# Altium PCB Layout.PcbDoc
Units mm, origin at the board's own origin, x right, y up, seen from the top; angles counter-clockwise.
Board outline 72.5 x 55.5 mm, 4 copper layers (Top Layer, Ground Layer, Power Layer, Bottom Layer), stack 1.591 mm thick; 70 components, 36 nets, 228 pads, 194 vias.
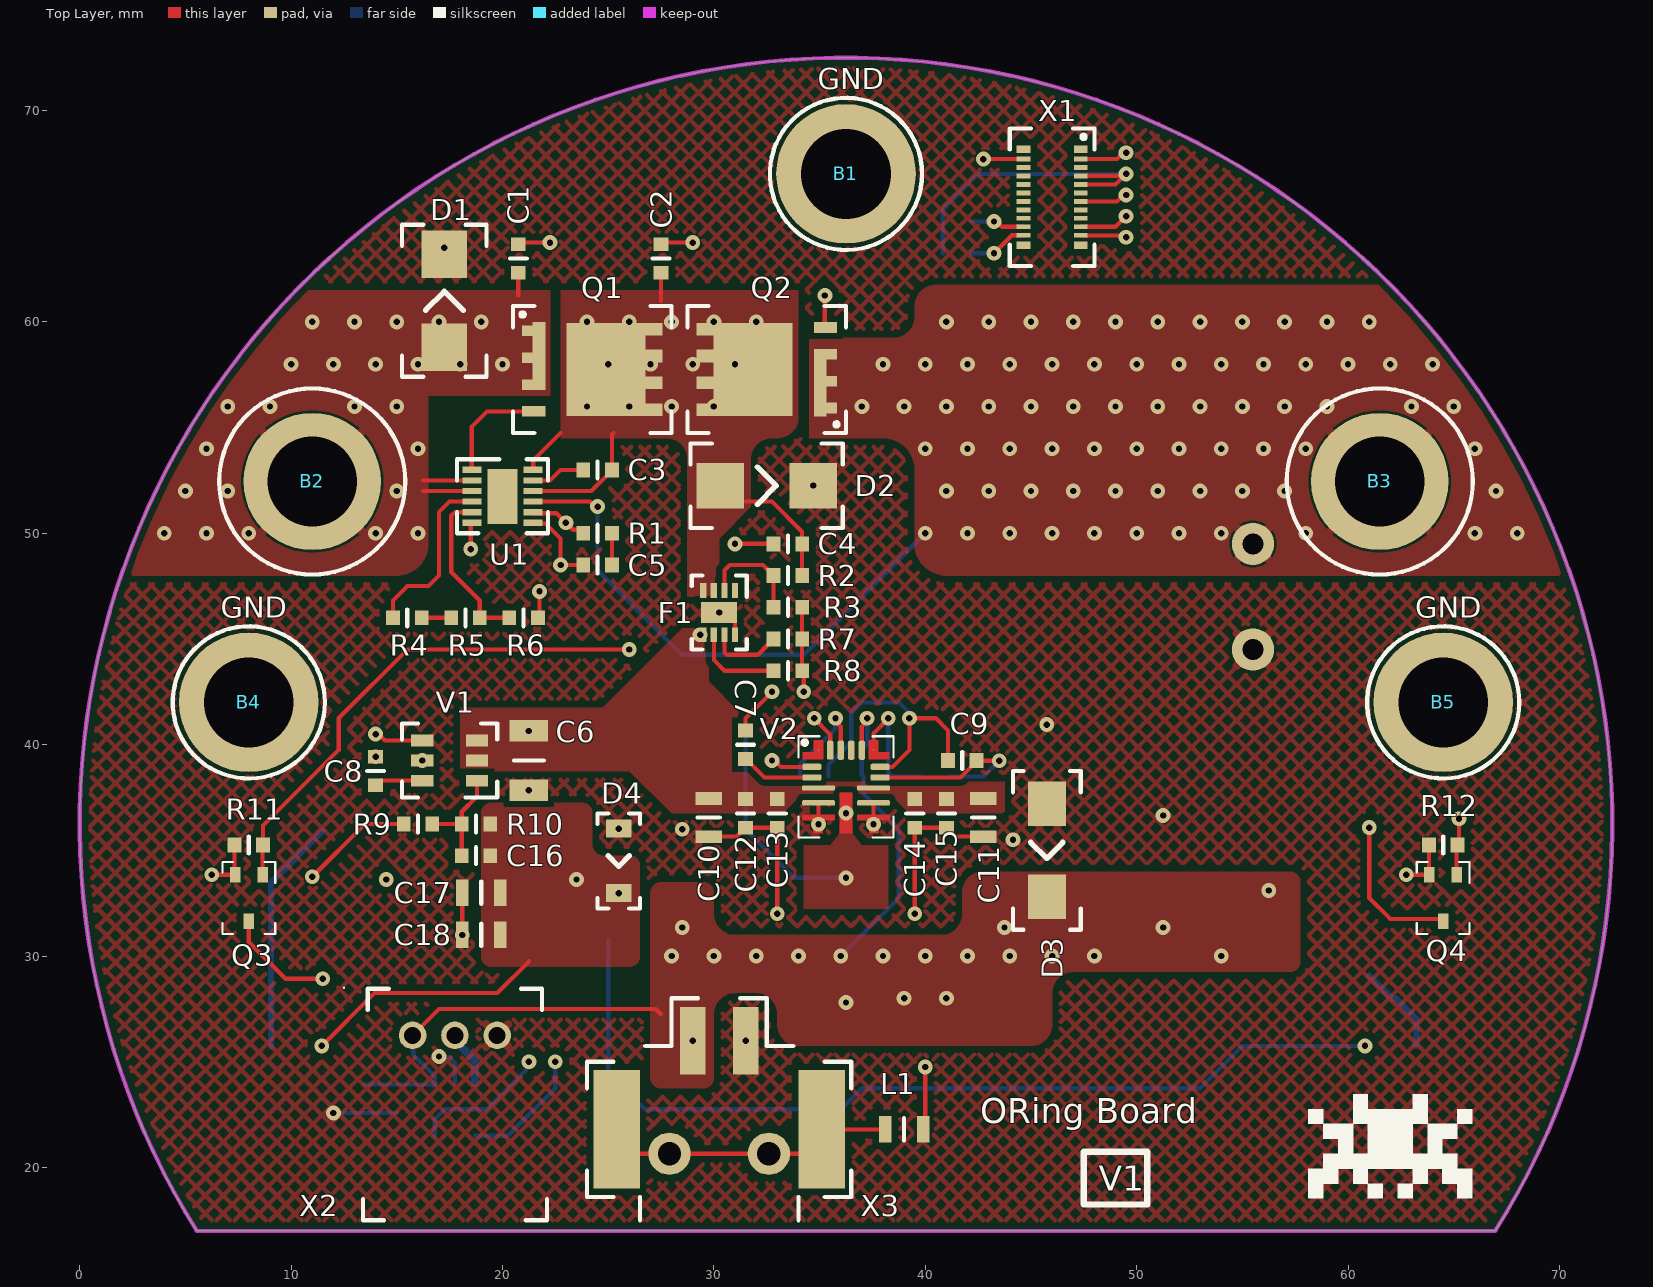
[diagram p0: Top Layer view]
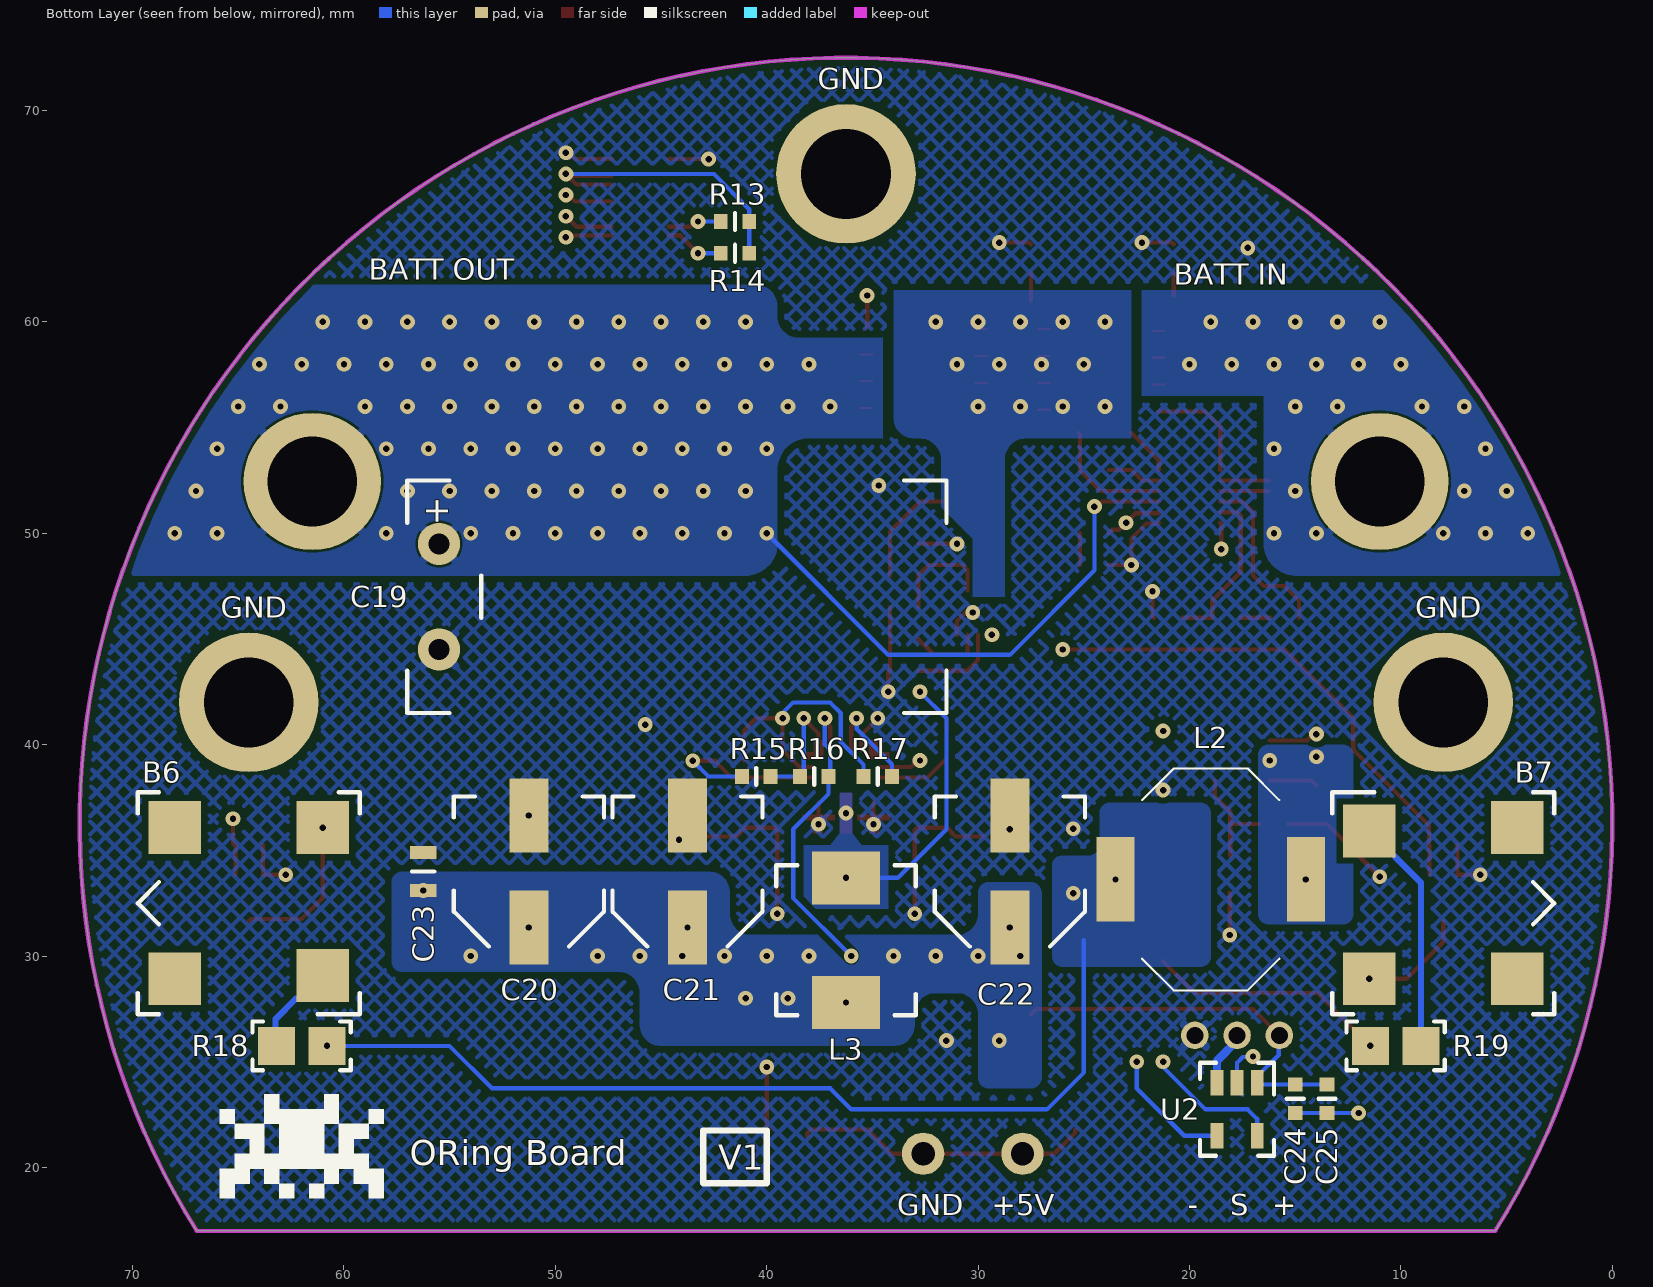
[diagram p1: Bottom Layer view, seen from below]
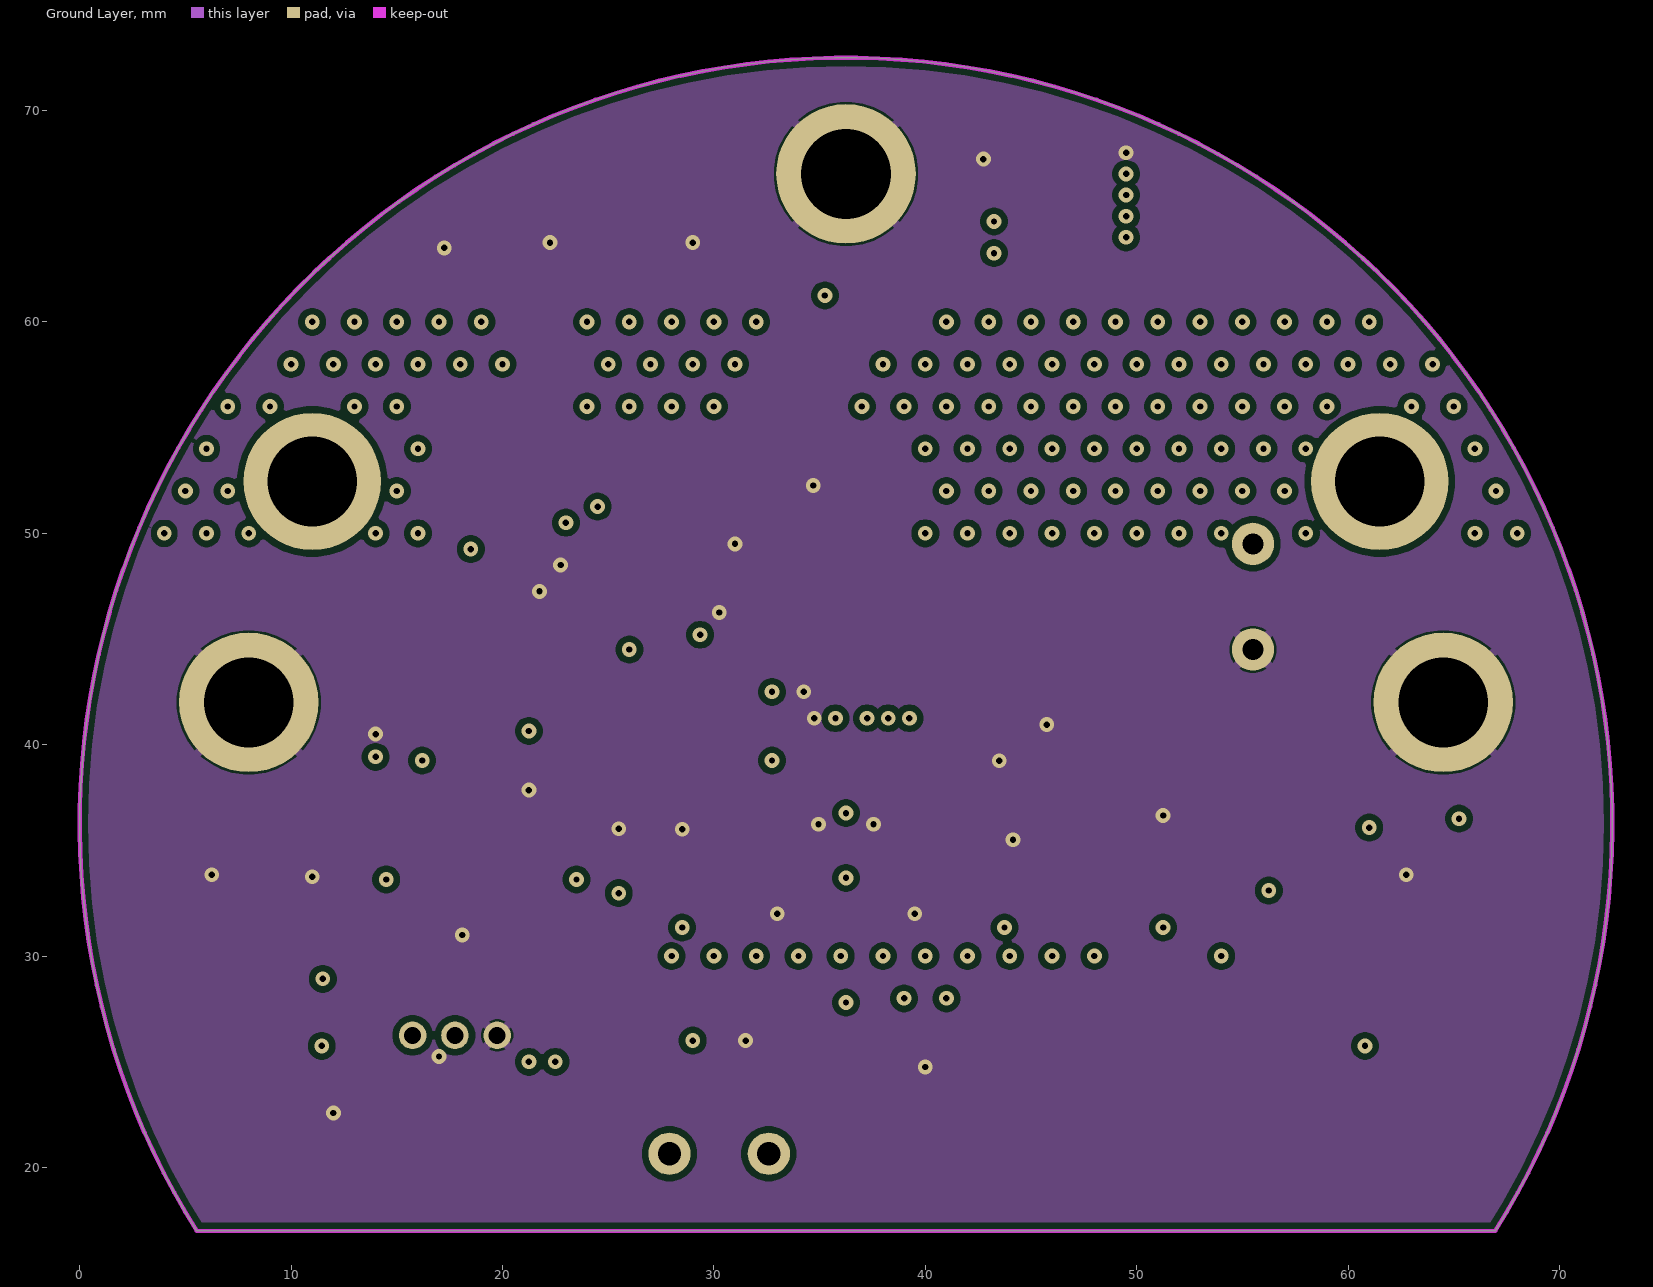
[diagram p2: Ground Layer]
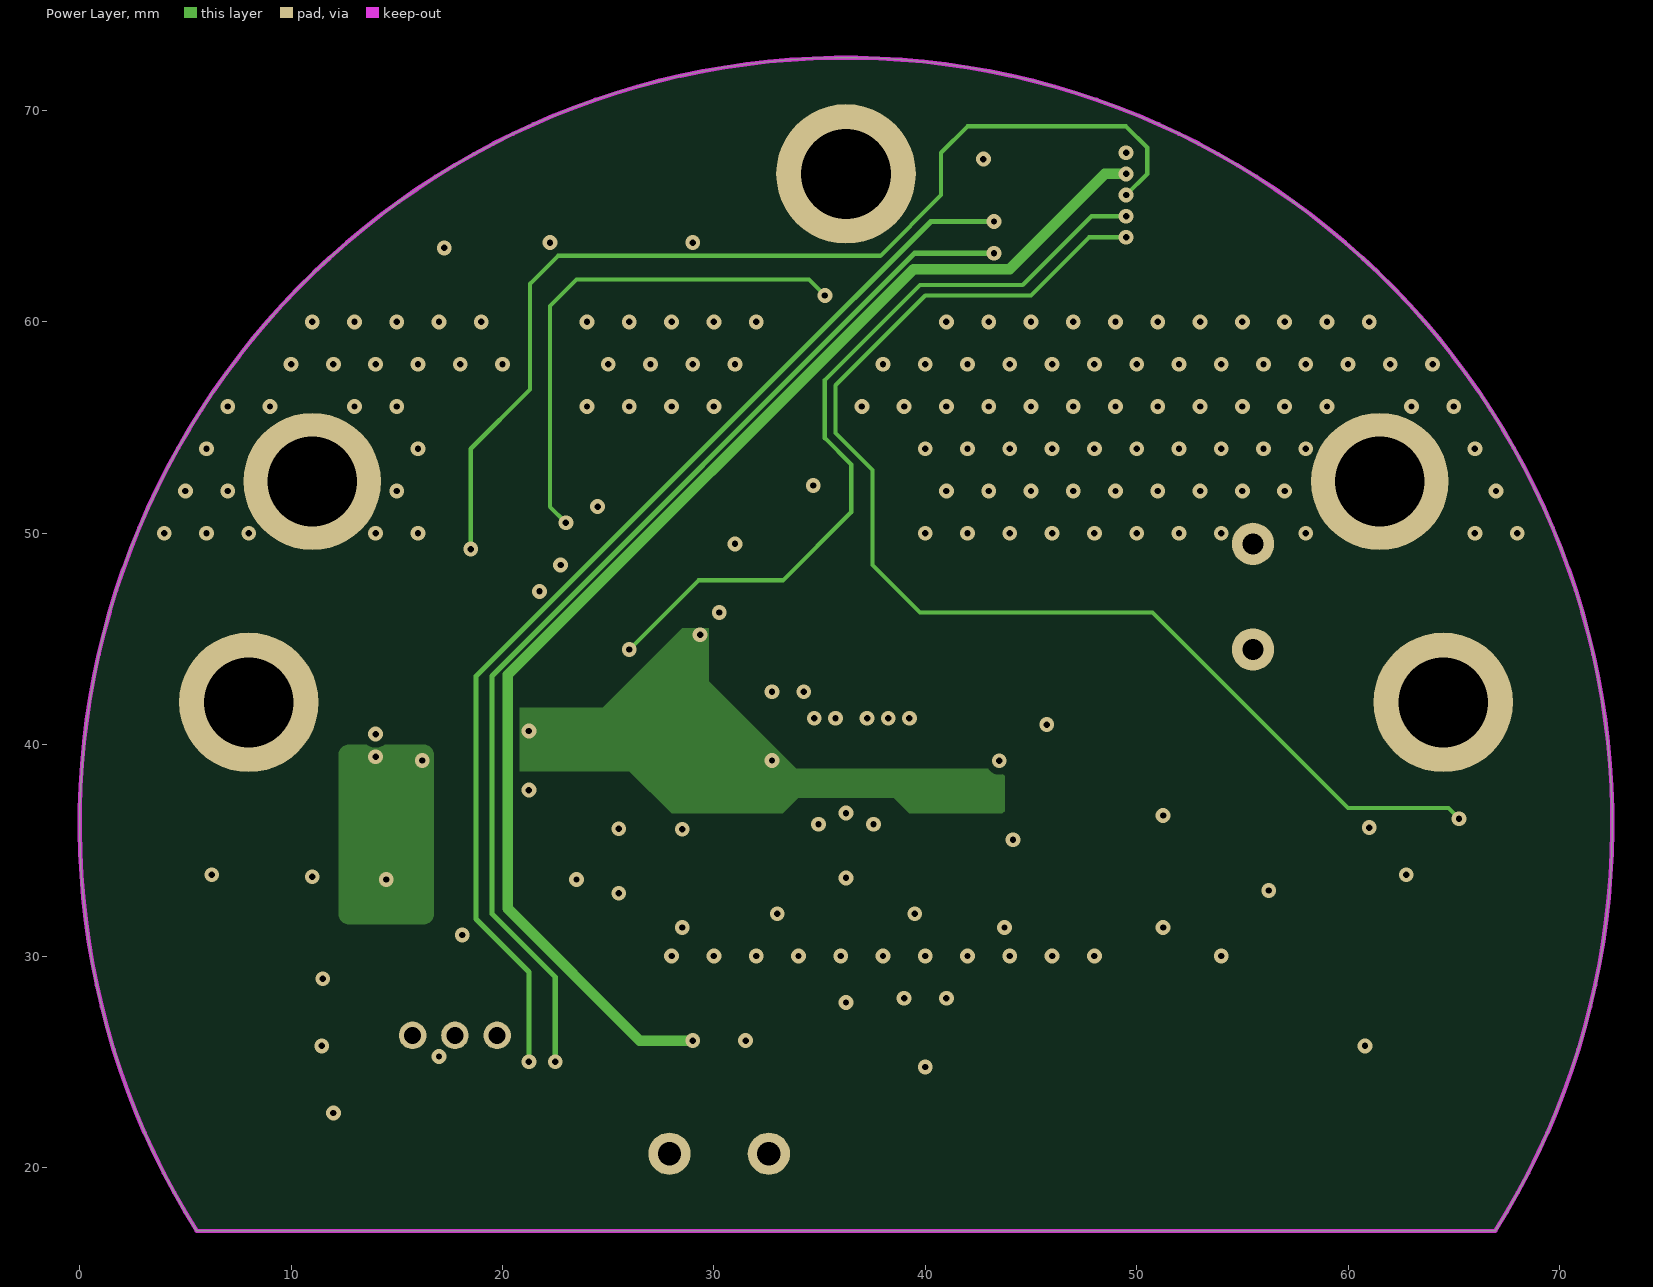
[diagram p3: Power Layer]

## Layer stack, top to bottom
Top Solder: solder mask 0.0102, Solder Resist, Dk 3.8
Top Layer: signal copper 0.035
Dielectric 2: prepreg 0.2104, 7628*1, Dk 4.4
Ground Layer: signal copper 0.0175
Dielectric 1: dielectric 1.065, FR-4, Dk 4.8
Power Layer: signal copper 0.0175
Dielectric 3: prepreg 0.2104, 7628*1, Dk 4.4
Bottom Layer: signal copper 0.035
Bottom Solder: solder mask 0.0102, Solder Resist, Dk 3.8

## Board outline
5.534,17 cw(c36.25,36.25) 66.966,17

## Design rules (kind name [scope] priority, off if disabled: settings)
BoardOutlineClearance [All] p1: gap=0.2 ignorepadtopadclearanceinfootprint=FALSE
Clearance "inPolygon Clearance" [InPolygon] p1: gap=0.3 ignorepadtopadclearanceinfootprint=TRUE // this rule ensures that every net within a polygon of a different net has a set clearance from the poly
Clearance "High Current Polygon Clearance" [(InPolygon AND InNetClass('High_Current_Nets'))] p2: gap=0 ignorepadtopadclearanceinfootprint=TRUE // this rule ensures that every net within a polygon of a different net has a set clearance from the poly
Clearance "Different Diff Pair" [All] p3: gap=0.2 ignorepadtopadclearanceinfootprint=TRUE
Clearance "Same Diff Pair" [All] p4: gap=0.1 ignorepadtopadclearanceinfootprint=TRUE
Clearance "Different Nets" [not InAnyDifferentialPair] p5: gap=0.3 ignorepadtopadclearanceinfootprint=TRUE except(0.1: Arc-SMDPad Arc-THPad Arc-Via Arc-Text Track-SMDPad Track-THPad Track-Via Track-Text SMDPad-Text THPad-Text Via-Text Fill-Text Poly-Text Region-Text Text-Text; 0.12: Arc-Arc Arc-Track Track-Track; 0.15: SMDPad-SMDPad SMDPad-THPad SMDPad-Via THPad-THPad THPad-Via Via-Via; 0.2: Arc-Hole Track-Hole SMDPad-Hole THPad-Hole Via-Hole Fill-Hole Poly-Hole Region-Hole Text-Hole)
Clearance "Same Net" [not InAnyDifferentialPair] p6: gap=0 ignorepadtopadclearanceinfootprint=TRUE except(0.1: THPad-Via; 0.18: Arc-Arc Arc-Track Track-Track)
ComponentClearance [All] p1: gap=0.102 collisioncheckmode=3 verticalgap=0.102 showdistances=TRUE
DiffPairsRouting "Ethernet Routing" [InDifferentialPairClass('Ethernet_Pairs')] p1: maxlimit=0.25 minlimit=0.2 mostfreqgap=0.25 toplayer_maxgap=0.2 toplayer_prefgap=0.2 toplayer_minwidth=0.25 toplayer_maxwidth=0.25 toplayer_prefwidth=0.25 midlayer1_mingap=0.25 midlayer1_minwidth=0.19 midlayer1_maxwidth=0.19 midlayer1_prefwidth=0.19 midlayer2_mingap=0.25 midlayer2_minwidth=0.19 midlayer2_maxwidth=0.19 midlayer2_prefwidth=0.19 bottomlayer_maxgap=0.2 bottomlayer_prefgap=0.2 bottomlayer_minwidth=0.25 bottomlayer_maxwidth=0.25 bottomlayer_prefwidth=0.25 impedanceprofiledriven=TRUE maxuncoupledlength=12.7
DiffPairsRouting "USB Routing" [InDifferentialPairClass('USB_Pairs')] p2: maxlimit=0.291 minlimit=0.127 mostfreqgap=0.291 toplayer_maxgap=0.127 toplayer_prefgap=0.127 toplayer_minwidth=0.23 toplayer_maxwidth=0.23 toplayer_prefwidth=0.23 midlayer1_mingap=0.291 midlayer1_minwidth=0.25 midlayer1_maxwidth=0.25 midlayer1_prefwidth=0.25 midlayer2_mingap=0.291 midlayer2_minwidth=0.25 midlayer2_maxwidth=0.25 midlayer2_prefwidth=0.25 bottomlayer_maxgap=0.127 bottomlayer_prefgap=0.127 bottomlayer_minwidth=0.23 bottomlayer_maxwidth=0.23 bottomlayer_prefwidth=0.23 maxuncoupledlength=12.7
DiffPairsRouting "CAN Routing" [InDifferentialPairClass('CAN_Pairs')] p3: maxlimit=0.907 minlimit=0.5 mostfreqgap=0.907 toplayer_maxgap=0.5 toplayer_prefgap=0.5 toplayer_minwidth=0.201 toplayer_maxwidth=0.201 toplayer_prefwidth=0.201 midlayer1_mingap=0.907 midlayer1_minwidth=0.155 midlayer1_maxwidth=0.155 midlayer1_prefwidth=0.155 midlayer2_mingap=0.907 midlayer2_minwidth=0.155 midlayer2_maxwidth=0.155 midlayer2_prefwidth=0.155 bottomlayer_maxgap=0.5 bottomlayer_prefgap=0.5 bottomlayer_minwidth=0.201 bottomlayer_maxwidth=0.201 bottomlayer_prefwidth=0.201 impedanceprofiledriven=TRUE maxuncoupledlength=12.7
Height [All] p1: minheight=0 maxheight=1816.048 prefheight=12.7
HoleSize [All] p1: absolutevalues=TRUE maxlimit=6.3 minlimit=0.3 maxpercent=80.000 minpercent=20.000
HoleToHoleClearance [All] p1: gap=0.25 allowstackedmicrovias=FALSE
MatchedLengths "XTAL Nets Matched Delays" [InNetClass('XTAL_Nets')] p1: tolerance=25.4 checknetsindiffpair=FALSE checkdiffpairvsdiffpair=TRUE checkxsignals=TRUE checkothers=TRUE usedelayunits=TRUE delaytolerance=10.000000
MatchedLengths "Diff Pair Matched Delays" [InDifferentialPairClass('Ethernet_Pairs') or InDifferentialPairClass('USB_Pairs') or InDifferentialPairClass('CAN_Pairs')] p2: tolerance=5 checknetsindiffpair=TRUE checkdiffpairvsdiffpair=FALSE checkxsignals=FALSE checkothers=FALSE usedelayunits=TRUE delaytolerance=100.000000 phasematching=TRUE phasedelaytolerance=5.000000 phasedistance=12.7
MinimumAnnularRing [All] p1: minimumring=0.2
MinimumSolderMaskSliver [All] p1: minsoldermaskwidth=0
PlaneClearance "Supply Net Clearance" [InNetClass('Supply_Nets')] p1: clearance=0.5
PlaneClearance "All Nets" [All] p2: clearance=0.3
PolygonConnect "High Current" [InNetClass('High_Current_Nets')] p1: thpad.connectstyle=Relief thpad.reliefconductorwidth=0.4 thpad.reliefentries=4 thpad.polygonreliefangle="90 Angle" thpad.airgapwidth=0.1 thpad.conductorbypadedge=TRUE thpad.mindistance=0.381 thpad.enablemindistance=FALSE smdpad.connectstyle=Direct smdpad.reliefconductorwidth=0.254 smdpad.reliefentries=4 smdpad.polygonreliefangle="90 Angle" smdpad.airgapwidth=0.254 via.connectstyle=Direct via.reliefconductorwidth=0.254 via.reliefentries=4 via.polygonreliefangle="90 Angle" via.airgapwidth=0.254
PolygonConnect "Supply Nets" [InNetClass('Supply_Nets') OR InNetClass('Supply_Net')] p2: connectstyle=Relief reliefconductorwidth=0.3 reliefentries=4 polygonreliefangle="90 Angle" conductorbypadedge=TRUE mindistance=0.381 enablemindistance=FALSE airgapwidth=0.254
PolygonConnect General [All] p3: connectstyle=Relief reliefconductorwidth=0.254 reliefentries=4 polygonreliefangle="90 Angle" airgapwidth=0.254
RoutingVias [All] p1: holewidth=0.2 width=0.35 viastyle="Through Hole" minholewidth=0.15 minwidth=0.3 maxholewidth=6.3 maxwidth=6.55
SilkToSilkClearance [All] p1: silktosilkclearance=0
SilkToSolderMaskClearance [All] p1: minsilkscreentomaskgap=0 clearancetoexposedcopper=TRUE
SolderMaskExpansion [All] p1: expansion=0.075 istentingtop=FALSE
SupplyNets "Schematic Supply Nets_6" [InNet('GND')] p1: voltage=0.000
SupplyNets "Schematic Supply Nets_3" [InNet('Earth')] p2: voltage=0.000
SupplyNets "Schematic Supply Nets_1" [InNet('+5V')] p3: voltage=0.000
SupplyNets "Schematic Supply Nets_4" [InNet('+12V')] p4: voltage=0.000
SupplyNets "Schematic Supply Nets" [InNet('BATT Switched')] p5: voltage=0.000
SupplyNets "Schematic Supply Nets_2" [InNet('BATTERY IN')] p6: voltage=0.000
UnRoutedNet [All] p1: checkbadconnections=TRUE
Width "nRF Width" [InNetClass('nRF Signal')] p1: maxlimit=0.379 minlimit=0.263 preferedwidth=0.379 toplayer_minwidth=0.379 midlayer1_maxwidth=0.263 midlayer1_prefwidth=0.263 midlayer2_maxwidth=0.263 midlayer2_prefwidth=0.263 bottomlayer_minwidth=0.379 minimp=50.000000 maximp=50.000000 favimp=50.000000 checkconnectedcopper=TRUE
Width [All] p2: maxlimit=100 minlimit=0.1 preferedwidth=0.2
20 further rules are at their usual default settings.

## Classes and differential pairs
component class "Current Sensor ADC": C24 C25 R13 R14 U2
component class Buzzers: B6 B7 Q3 Q4 R11 R12 R18 R19
net class High_Current_Nets: +5V +12V "+12V Reg SW" "BATT Switched" BATT_always_on "BATTERY IN" CAP DGATE GND HGATE NetC5_2 NetC7_2 VREG_IN
component class Power: C4 C6 C7 C8 C9 C10 C11 C12 C13 C14 C15 C16 C17 C18 C20 C21 C22 C23 D2 D3 D4 F1 L1 L2 L3 R2 R3 R7 R8 R9 R10 R15 R16 R17 V1 V2
component class "ORing Controller": C1 C2 C3 C5 C19 D1 Q1 Q2 R1 R4 R5 R6 U1
component class Connectors: B1 B2 B3 B4 B5 X1 X2 X3

## Components (designator, comment, footprint, x,y, rotation, side; value= is the part's Value field where it differs from the comment)
B1 "M4 4mm Spacer" "[Bolt] M4 len=4mm OD=6mm Spacer" 36.25,67 r0 top
B2 "M4 16mm" "[Bolt] M4 16mm Button Head Hex Bolt" 11,52.45 r0 top
B3 "M4 16mm" "[Bolt] M4 16mm Button Head Hex Bolt" 61.5,52.45 r0 top
B4 "M4 4mm Spacer" "[Bolt] M4 len=4mm OD=6mm Spacer" 8,42 r0 top
B5 "M4 4mm Spacer" "[Bolt] M4 len=4mm OD=6mm Spacer" 64.5,42 r0 top
B6 "Passive buzzer" "[Buzzer] Passive SMD 12V 80mA" 64.5,32.5 r0 bottom
B7 "Passive buzzer" "[Buzzer] Passive SMD 12V 80mA" 8,32.5 r180 bottom
C1 "[Cap] 0603 0.1uF 10% 50V" "[Cap] SMD 0603" 20.75,63 r270 top
C2 "[Cap] 0603 0.1uF 10% 50V" "[Cap] SMD 0603" 27.5,63 r270 top
C3 "[Cap] 0603 0.1uF 10% 50V" "[Cap] SMD 0603" 24.5,53 r0 top
C4 "[Cap] 0603 0.1uF 10% 50V" "[Cap] SMD 0603" 33.5,49.5 r0 top
C5 "[Cap] 0603 0.01uF 10% 50V" "[Cap] SMD 0603" 24.5,48.5 r0 top
C6 "[Cap] 1206 10uF 20% 50V" "[Cap] SMD 1206" 21.25,39.25 r90 top
C7 "[Cap] 0603 0.1uF 10% 50V" "[Cap] SMD 0603" 31.5,40 r90 top
C8 "[Cap] 0603 0.1uF 10% 50V" "[Cap] SMD 0603" 14,38.75 r270 top
C9 "[Cap] 0603 2.2uF 10% 25V" "[Cap] SMD 0603" 41.75,39.25 r180 top
C10 "[Cap] 0805 22uF 20% 25V" "[Cap] SMD 0805" 29.75,36.55 r90 top
C11 "[Cap] 0805 22uF 20% 25V" "[Cap] SMD 0805" 42.75,36.55 r90 top
C12 "[Cap] 0603 0.1uF 10% 50V" "[Cap] SMD 0603" 31.5,36.75 r90 top
C13 "[Cap] 0603 4.7uF 10% 25V" "[Cap] SMD 0603" 33,36.75 r90 top
C14 "[Cap] 0603 4.7uF 10% 25V" "[Cap] SMD 0603" 39.5,36.75 r90 top
C15 "[Cap] 0603 0.1uF 10% 50V" "[Cap] SMD 0603" 41,36.75 r90 top
C16 "[Cap] 0603 12pF 5% 50V" "[Cap] SMD 0603" 18.75,34.75 r0 top
C17 "[Cap] 0805 22uF 20% 25V" "[Cap] SMD 0805" 19,33 r0 top
C18 "[Cap] 0805 22uF 20% 25V" "[Cap] SMD 0805" 19,31 r0 top
C19 "[Cap] Thru-Hole 1000uF 20% 35V" "[Cap] Thru-Hole Right-Angle Polarized 10mm" 55.5,47 r270 bottom
C20 "[Cap] 6.3mm 47uF 20% 35V" "[Cap] SMD Polarized, 6.3mm" 51.25,34 r90 bottom
C21 "[Cap] 6.3mm 47uF 20% 35V" "[Cap] SMD Polarized, 6.3mm" 43.75,34 r90 bottom
C22 "[Cap] 6.3mm 47uF 20% 35V" "[Cap] SMD Polarized, 6.3mm" 28.5,34 r90 bottom
C23 "[Cap] 0805 22uF 20% 25V" "[Cap] SMD 0805" 56.25,34 r270 bottom
C24 "[Cap] 0603 0.1uF 10% 50V" "[Cap] SMD 0603" 15,23.25 r90 bottom
C25 "[Cap] 0603 10uF 20% 16V" "[Cap] SMD 0603" 13.5,23.25 r90 bottom
D1 "DO-214AA" "[Diode] SMD DO-214AA" 17.25,61 r90 top
D2 "DO-214AA" "[Diode] SMD DO-214AA" 32.5,52.25 r0 top
D3 "DO-214AC" "[Diode] SMD DO-214AC" 45.75,35 r270 top
D4 "SOD-123F" "[Diode] SOD-123F" 25.5,34.5 r270 top
F1 "[E-Fuse] 3-18V 4A" "[E-Fuse] 3-18V 4A" 30.25,46.25 r270 top
L1 "652-MH2029-300Y" "[Ferrite] SMD 0805" 39,21.8 r0 top
L2 "[10uH] SMD Nonstandard 3.8A" "[10uH] SMD Nonstandard 3.8A" 19,33.625 r0 bottom
L3 "[2.2uH] SMD Nonstandard 10A" "[Inductor] SMD 7.4 X 6.6 X 3 MM" 36.25,30.75 r270 bottom
Q1 "[NMOS] SMD 40V 175A 0.55mOhm" "[NMOS] SMD 40V 175A 0.55mOhm"#1 24.25,57.75 r270 top
Q2 "[NMOS] SMD 40V 175A 0.55mOhm" "[NMOS] SMD 40V 175A 0.55mOhm"#2 32.5,57.75 r90 top
Q3 "[NMOS] SMD 20V 1.4A 160mOhm" SOT323 8,32.75 r270 top
Q4 "[NMOS] SMD 20V 1.4A 160mOhm" SOT323 64.5,32.75 r270 top
R1 "[100] SMD 0603 1% 1/10W" "[Res] SMD 0603" 24.5,50 r0 top
R2 "[1k] SMD 0603 1% 1/10W" "[Res] SMD 0603" 33.5,48 r0 top
R3 "[392k] SMD 0603 1% 1/10W" "[Res] SMD 0603" 33.5,46.5 r180 top
R4 "[90.9k] SMD 0603 1% 1/10W" "[Res] SMD 0603" 15.5,46 r180 top
R5 "[9.09k] SMD 0603 1% 1/10W" "[Res] SMD 0603" 18.25,46 r180 top
R6 "[3.48k] SMD 0603 1% 1/10W_1" "[Res] SMD 0603" 21,46 r0 top
R7 "[698] SMD 0603 1% 1/10W_1" "[Res] SMD 0603" 33.5,45 r180 top
R8 "[10k] SMD 0603 1% 1/8W" "[Res] SMD 0603" 33.5,43.5 r180 top
R9 "[30.1k] SMD 0603 1% 1/10W" "[Res] SMD 0603" 16,36.25 r0 top
R10 "[422k] SMD 0603 1% 1/10W" "[Res] SMD 0603" 18.75,36.25 r0 top
R11 "[1M] SMD 0603 1% 1/10W" "[Res] SMD 0603" 8,35.25 r0 top
R12 "[1M] SMD 0603 1% 1/10W" "[Res] SMD 0603" 64.5,35.25 r0 top
R13 "[1k] SMD 0603 1% 1/10W" "[Res] SMD 0603" 41.5,64.75 r180 bottom
R14 "[1k] SMD 0603 1% 1/10W" "[Res] SMD 0603" 41.5,63.25 r180 bottom
R15 "[10k] SMD 0603 1% 1/8W" "[Res] SMD 0603" 40.5,38.5 r180 bottom
R16 "[52.3k] SMD 0603 1% 1/10W" "[Res] SMD 0603" 37.75,38.5 r180 bottom
R17 "[1k] SMD 0603 1% 1/10W" "[Res] SMD 0603" 34.75,38.5 r180 bottom
R18 "[100] SMD 1206 0.5% 1W" "[Res] SMD 1206" 62,25.75 r180 bottom
R19 "[100] SMD 1206 0.5% 1W" "[Res] SMD 1206" 10.25,25.75 r0 bottom
U1 "[ORing] Back-to-Back External NMOS Controller" "[ORing] Back-to-Back External NMOS Controller" 20,51.75 r0 top
U2 "[ADC] 2.7-5.5V 12bit Single-Ended" "[ADC] 2.7-5.5V 12bit Single-Ended" 17.75,22.75 r270 bottom
V1 "SOT-23" SOT-23 17.5,39.25 r180 top
V2 "[Switching] SMD 0.8-10V 8A" "[Switching] 17-PowerWFQFN" 36.25,38 r0 top
X1 "[Mezzanine] 20pin 0.4mm Female" "[Mezzanine] 20pin 0.4mm Female" 46,65.9 r270 top
X2 "[Sherlock] 3pin 90deg" "[Sherlock] 3pin 90deg" 17.75,26.25 r180 top
X3 "[Pheonix] 2pin 2.5mm pitch" "[Pheonix] 2pin 2.5mm pitch" 30.25,26 r0 top

## Footprints (in the part's own frame and the unit in brackets; to place one, negate y for a bottom-side part, rotate by r counter-clockwise, add the part's x,y. Pads: shape width x height; smd on the part's side, far side on the other; paste and mask are expansions set on the pad)
"[10uH] SMD Nonstandard 3.8A" [mm] "SRU1038-100Y"
  rect 1.8x4 smd: 1(-4.5,0) 2(4.5,0)
  silkscreen extent -3.25,-5.25 3.25,5.25, body extent -5,-5 5,5, height 3.85
"[ADC] 2.7-5.5V 12bit Single-Ended" [mm] "MCP3221A0T-E/OT"
  rect 1.2x0.6 smd: 1(-1.25,0.95) 2(-1.25,0) 3(-1.25,-0.95) 4(1.25,-0.95) 5(1.25,0.95)
  silkscreen extent -2.2,-1.75 2.2,1.75, body extent -1.4,-1.45 1.4,1.45, height 1.2
"[Bolt] M4 16mm Button Head Hex Bolt" [mm]
  round 6.5 hole 4.25: 1(0,0)
  silkscreen extent -4.4,-4.4 4.4,4.4, body extent -3.8,-3.8 3.8,3.8, height 2.2
"[Bolt] M4 len=4mm OD=6mm Spacer" [mm]
  round 6.6 hole 4.25: 1(0,0)
  silkscreen extent -3.6,-3.6 3.6,3.6, body extent -3,-3 3,3, height 4
"[Buzzer] Passive SMD 12V 80mA" [mm] "CT08E-16S400-2"
  rect 2.5x2.5 smd: 1(-3.5,3.424) 2(-3.5,-3.576) MP(3.5,-3.576) MP(3.5,3.576)
  silkscreen extent -5.25,-5.25 5.25,5.25, body extent -4.25,-4.25 4.25,4.25, height 4
"[Cap] SMD 0603" [mm]
  rect 0.65x0.7 smd: 1(-0.675,0) 2(0.675,0)
  silkscreen extent 0,-0.4 0,0.4, body extent -0.8,-0.45 0.8,0.45, height 0.8
"[Cap] SMD 0805" [mm]
  rect 0.6x1.25 smd: 1(-0.9,0) 2(0.9,0)
  silkscreen extent 0,-0.53 0,0.53, body extent -1,-0.63 1,0.63, height 1
"[Cap] SMD 1206" [mm]
  rect 1.02x1.82 smd: 1(-1.4,0) 2(1.4,0)
  silkscreen extent 0,-0.7 0,0.7, body extent -1.7,-0.9 1.7,0.9, height 1.8
"[Cap] SMD Polarized, 6.3mm" [mm]
  rect 3.5x1.85 smd: 1(-2.65,0) 2(2.65,0)
  silkscreen extent -3.55,-3.55 3.55,3.55, body extent -3.7,-3.4 3.7,3.4, height 6.1
"[Cap] Thru-Hole Right-Angle Polarized 10mm" [mm]
  round 2 hole 1: 1(-2.5,0) 2(2.5,0)
  silkscreen extent -5.5,-1.5 5.5,24, body extent -5,-0.3 5,23.5, height 9.99
"[Diode] SMD DO-214AA" [mm]
  rect 2.25x2.15 smd: 1(2.2,0) 2(-2.2,0)
  silkscreen extent -3.6,-2 3.6,2, body extent -2.68,-1.75 2.68,1.75, height 2.3
"[Diode] SMD DO-214AC" [mm]
  rect 2.1x1.8 smd: 1(2.2,0) 2(-2.2,0)
  silkscreen extent -3.75,-1.6 3.75,1.6, body extent -3.07,-1.33 3.07,1.33, height 2.39
"[Diode] SOD-123F" [mm]
  rect 0.85x1.2 smd: 1(1.525,0) 2(-1.525,0)
  silkscreen extent -2.25,-1 2.25,1, body extent -1.75,-0.8 1.75,0.8, height 0.8
"[E-Fuse] 3-18V 4A" [mm] "TPS259571DSGR"
  rect 0.7x0.3 smd: 1(-1.05,0.75) 2(-1.05,0.25) 3(-1.05,-0.25) 4(-1.05,-0.75) 5(1.05,-0.75) 6(1.05,-0.25) 7(1.05,0.25) 8(1.05,0.75)
  rect 1x1.7 smd: 9(0,0)
  silkscreen extent -1.75,-1.3 1.75,1.3, body extent -1.05,-1 1.05,1, height 0.8
"[Ferrite] SMD 0805" [mm]
  rect 0.6x1.25 smd: 1(-0.9,0) 2(0.9,0)
  silkscreen extent 0,-0.53 0,0.53, body extent -1,-0.6 1,0.6, height 1.1
"[Inductor] SMD 7.4 X 6.6 X 3 MM" [mm]
  rect 2.5x3.2 smd: 1(-2.95,0) 2(2.95,0)
  silkscreen extent -3.55,-3.3 3.55,3.3, body extent -3.55,-3.3 3.55,3.3, height 3
"[Mezzanine] 20pin 0.4mm Female" [mm] "DF40C-20DP-0.4V(51)"
  rect 0.23x0.66 smd paste+0 mask+0.102: 1(-1.8,1.355) 2(-1.8,-1.355) 3(-1.4,1.355) 4(-1.4,-1.355) 5(-1,1.355) 6(-1,-1.355) 7(-0.6,1.355) 8(-0.6,-1.355) 9(-0.2,1.355) 10(-0.2,-1.355) 11(0.2,1.355) 12(0.2,-1.355) 13(0.6,1.355) 14(0.6,-1.355) 15(1,1.355) 16(1,-1.355) 17(1.4,1.355) 18(1.4,-1.355) 19(1.8,1.355) 20(1.8,-1.355)
  rect 0.35x0.66 smd paste+0 mask+0.102: MP(-2.275,1.355) MP(-2.275,-1.355) MP(2.275,1.355) MP(2.275,-1.355)
  silkscreen extent -3.25,-2 3.25,2, body extent -2.76,-1.48 2.76,1.49, height 1.14
"[NMOS] SMD 40V 175A 0.55mOhm"#1 [mm] "IAUCN04S7N005ATMA1"
  rect 0.5x0.5 smd: 1(-1.825,-3.075) 1(-0.555,-3.075) 1(0.715,-3.075)
  rect 3.2x0.6 smd: 1(-0.635,-2.525)
  rect 0.5x1.1 smd: 2(1.985,-2.775)
  rect 0.6x0.8 smd: 3(-1.905,2.925) 3(-0.635,2.925) 3(0.635,2.925) 3(1.905,2.925)
  rect 4.41x3.75 smd: 3(0,0.65)
  Top Layer lines w0.1: 0.715,-3.075 0.715,-2.525 0.715,-2.495 ; -0.555,-3.075 -0.555,-2.525 -0.555,-2.495 ; -1.825,-3.075 -1.825,-2.525 -1.825,-2.495 ; 1.905,2.345 1.905,2.925 ; 0.635,2.345 0.635,2.925 ; -0.635,2.345 -0.635,2.925 ; -1.905,2.345 -1.905,2.925
  silkscreen extent -3,-3.75 3,3.75, body extent -2.71,-3.22 2.71,3.22, height 1
"[NMOS] SMD 40V 175A 0.55mOhm"#2 [mm] "IAUCN04S7N005ATMA1"
  rect 0.5x0.5 smd: 1(-1.825,-3.075) 1(-0.555,-3.075) 1(0.715,-3.075)
  rect 3.2x0.6 smd: 1(-0.635,-2.525)
  rect 0.5x1.1 smd: 2(1.985,-2.775)
  rect 0.6x0.8 smd: 3(-1.905,2.925) 3(-0.635,2.925) 3(0.635,2.925) 3(1.905,2.925)
  rect 4.41x3.75 smd: 3(0,0.65)
  Top Layer lines w0.1: -1.905,2.925 -1.905,2.345 ; -0.635,2.925 -0.635,2.345 ; 0.635,2.925 0.635,2.345 ; 1.905,2.925 1.905,2.345 ; -1.825,-2.495 -1.825,-3.075 ; -0.555,-2.495 -0.555,-3.075 ; 0.715,-2.495 0.715,-3.075
  silkscreen extent -3,-3.75 3,3.75, body extent -2.71,-3.22 2.71,3.22, height 1
"[ORing] Back-to-Back External NMOS Controller" [mm] "LM74810QDRRRQ1"
  rect 0.9x0.3 smd: 1(-1.45,1.25) 2(-1.45,0.75) 3(-1.45,0.25) 4(-1.45,-0.25) 5(-1.45,-0.75) 6(-1.45,-1.25) 7(1.45,-1.25) 8(1.45,-0.75) 9(1.45,-0.25) 10(1.45,0.25) 11(1.45,0.75) 12(1.45,1.25)
  rect 1.4x2.6 smd: 13(0,0)
  silkscreen extent -2.15,-1.75 2.15,1.75, body extent -1.5,-1.5 1.5,1.5, height 0.8
"[Pheonix] 2pin 2.5mm pitch" [mm] "1778764"
  rect 1.2x3.2 smd: 1(-1.25,0) 2(1.25,0)
  rect 2.2x5.6 smd: MP(-4.85,-4.2) MP(4.85,-4.2)
  round 2 hole 1.1: MP(-2.35,-5.35) MP(2.35,-5.35)
  silkscreen extent -6.25,-8.5 6.25,2, body extent -5.3,-8.18 5.3,1.32, height 5
"[Res] SMD 0603" [mm]
  rect 0.65x0.7 smd: 1(-0.675,0) 2(0.675,0)
  silkscreen extent 0,-0.4 0,0.4, body extent -0.8,-0.45 0.8,0.45, height 0.8
"[Res] SMD 1206" [mm]
  rect 1.75x1.8 smd: 1(-1.2,0) 2(1.2,0)
  silkscreen extent -2.32,-1.15 2.32,1.15, body extent -1.6,-0.8 1.6,0.8, height 0.55
"[Sherlock] 3pin 90deg" [mm] "0353630360"
  round 1.3 hole 0.8: 1(2,0) 2(0,0) 3(-2,0)
  silkscreen extent -4.35,-2.2 4.35,8.75, body extent -4.85,-1.98 4.85,8.52, height 5.43
"[Switching] 17-PowerWFQFN" [mm]
  rrect50% 0.9x0.3 smd: 1(-1.612,0.95) 2(-1.612,0.45) 10(1.612,0.45) 11(1.612,0.95)
  rrect50% 1.55x0.25 smd: 3(-1.299,-0.05) 4(-1.299,-0.75) 8(1.3,-0.75) 9(1.3,-0.05)
  round 0.025 smd: 5(-1.3,-1.763) 6(0,-1.238) 7(1.3,-1.763) 12(1.3,1.75) 12(1.787,1.475) 17(-1.788,1.475) 17(-1.3,1.75)
  rect 0.127x0.127 smd paste-0.064 mask-0.064: 10(1.612,0.45) 11(1.612,0.95)
  rrect50% 0.3x0.9 smd: 13(0.75,1.736) 14(0.25,1.736) 15(-0.25,1.737) 16(-0.75,1.737)
  Top Layer region: -0.3,-0.275 0.3,-0.275 0.3,-2.2 -0.3,-2.2
  Top Layer region: -1.1,-1.575 -0.525,-1.575 -0.525,-1.325 -2.075,-1.325 -2.075,-1.575 -1.55,-1.575 -1.55,-2.2 -1.1,-2.2
  Top Layer region: 1.1,-1.575 0.525,-1.575 0.525,-1.325 2.075,-1.325 2.075,-1.575 1.55,-1.575 1.55,-2.2 1.1,-2.2
  Top Layer region: -1.525,1.65 -1.525,1.3 -1.075,1.3 -1.075,2.2 -1.525,2.2
  Top Layer region: -2.05,1.65 -1.525,1.65 -1.525,1.3 -2.05,1.3
  Top Layer region: 1.525,1.65 1.525,1.3 1.075,1.3 1.075,2.2 1.525,2.2
  Top Layer region: 2.05,1.65 1.525,1.65 1.525,1.3 2.05,1.3
  silkscreen extent -2.25,-2.4 2.25,2.4, body extent -1.75,-1.88 1.75,1.88, height 0.8
SOT323 [mm]
  rect 0.75x0.5 smd: 1(-1.1,0.65) 2(-1.1,-0.65) 3(1.1,0)
  silkscreen extent -1.7,-1.25 1.7,1.25, body extent -1.05,-1 1.05,1, height 1
SOT-23 [mm]
  rect 1.05x0.55 smd: 1(-1.3,0.95) 2(-1.3,0) 3(-1.3,-0.95) 4(1.3,-0.95) 5(1.3,0) 6(1.3,0.95)
  silkscreen extent -2.25,-1.75 2.25,1.75, body extent -1.4,-1.45 1.4,1.45, height 1

## Part data
B1 B4 B5: library part "[Bolt] M4 len=4mm OD=6mm Spacer", "ID: 4mm / OD: 6mm", ComponentLink1Description="McMaster Supplier", ComponentLink1URL=https://www.mcmaster.com/94669A006/, System=Connector
B2 B3: library part "[Bolt] M4 16mm Button Head Hex Bolt", "92095A194", ComponentLink1Description="McMaster Link", ComponentLink1URL=https://www.mcmaster.com/92095A194/, System=Connector
B6 B7: library part "[Buzzer] Passive SMD 12V 80mA", "CT08E-16S400-2", Supplier Part Number 1=2603-CT08E-16S400-2CT-ND, Supplier 1=DigiKey
C1 C2 C3 C4 C7 C8 C12 C15 C24: "CL10B104KB8NNNC", Capacitance=100nF, Max Voltage=50V, Size Package=0603, Supplier Part Number 1=1276-1000-6-ND, Tolerance=10%, Supplier 1=DigiKey
C5: "C0603C103K5RACTU", Capacitance=10nF, Max Voltage=50V, Size Package=0603, Supplier Part Number 1=399-C0603C103K5RACTUDKR-ND, Tolerance=10%, Supplier 1=DigiKey
C6: "CGA5L3X5R1H106M160AB", Capacitance=10uF, Max Voltage=50V, Size Package=1206, Supplier Part Number 1=445-12883-6-ND, Tolerance=10%, Supplier 1=DigiKey
C9: "GRM188R61E225KA12D", Capacitance=2.2uF, Max Voltage=25V, Size Package=0603, Supplier Part Number 1=490-10731-1-ND, Tolerance=10%, Supplier 1=DigiKey
C10 C11 C17 C18 C23: "CL21A226MAYNNWE", Capacitance=22uF, Max Voltage=25V, Size Package=0805, Supplier Part Number 1=1276-CL21A226MAYNNWECT-ND, Tolerance=20%, Supplier 1=DigiKey
C13 C14: "GRM188R61E475KE11D", Capacitance=4.7uF, Max Voltage=25V, Size Package=0603, Supplier Part Number 1=490-7203-6-ND, Tolerance=10%, Supplier 1=DigiKey
C16: "C0603C120J5GACTU", Capacitance=12pF, Max Voltage=50V, Size Package=0603, Supplier Part Number 1=399-C0603C120J5GACTUCT-ND, Tolerance=5%, Supplier 1=DigiKey
C19: "35PK1000MEFC10X20", Capacitance=1000uF, Max Voltage=35V, Size Package=Thru-Hole, Supplier Part Number 1=1189-1742-ND, Tolerance=20%, Supplier 1=DigiKey
C20 C21 C22: "UWT1V470MCL1GS", Capacitance=47uF, Max Voltage=35V, Size Package=6.3mm, Supplier Part Number 1=493-2202-1-ND, Tolerance=20%, Supplier 1=DigiKey
C25: "GRM188C81C106MA73D", Capacitance=10uF, Max Voltage=16V, Size Package=0603, Supplier Part Number 1=490-7198-1-ND, Tolerance=20%, Supplier 1=DigiKey
D1 D2: library part "[TVS] SMBJ33CA", "SMBJ33CA", Optimal Zener Voltage=33V, Supplier Part Number 1=SMBJ33CA-FDICT-ND, Supplier 1=DigiKey, Wattage=600W
D3: library part "[Zener] SMD 5.6V 1W 5%", "SMAZ5V6-13-F", Optimal Zener Voltage=5.6V, Supplier Part Number 1=SMAZ5V6-FDICT-ND, Tolerance=5%, Supplier 1=DigiKey, Wattage=1W
D4: library part "[Zener] SMD 12.75V 1W 5.88%", "KDZVTR12B", Optimal Zener Voltage=12.75V, Supplier Part Number 1=KDZVTR12BCT-ND, Tolerance=5.88%, Supplier 1=DigiKey, Wattage=1W
F1: "TPS259571DSGR", Supplier Part Number 1=296-50500-1-ND, Supplier 1=DigiKey
L1: library part "[Ferrite] SMD 0805 3A 30ohm", Res @ Freq="30 @ 100MHz", Size Package=0805, Supplier Part Number 1=MH2029-300YCT-ND, Supplier 1=DigiKey
L2: "SRU1038-100Y", DC Resistance=25mOhm, Inductance=10uH, Package="10 x 10mm", Supplier Part Number 1=SRU1038-100YCT-ND, Supplier 1=DigiKey
L3: "ECS-MPIL0630-2R2MC", Inductance=2.2uH, Package="7.4 x 6.6mm", Supplier Part Number 1=XC2402CT-ND, Supplier 1=DigiKey
Q1 Q2: "IAUCN04S7N005ATMA1", Supplier Part Number 1=448-IAUCN04S7N005ATMA1CT-ND, Supplier 1=DigiKey
Q3 Q4: "BSS816NWH6327XTSA1", Supplier Part Number 1=BSS816NWH6327XTSA1CT-ND, Supplier 1=DigiKey
R1: "RC0603FR-07100RL", Resistance=100, Size Package=0603, Supplier Part Number 1=311-100HRDKR-ND, Tolerance=1%, Supplier 1=DigiKey, Wattage=1/10W
R2 R13 R14 R17: "RMCF0603FT1K00", Resistance=1k, Size Package=0603, Supplier Part Number 1=RMCF0603FT1K00DKR-ND, Tolerance=1%, Supplier 1=DigiKey, Wattage=1/10W
R3: "CR0603-FX-3923ELF", Resistance=392k, Size Package=0603, Supplier Part Number 1=118-CR0603-FX-3923ELFCT-ND, Tolerance=1%, Supplier 1=DigiKey, Wattage=1/10W
R4: "CR0603-FX-9092ELF", Resistance=90.9k, Size Package=0603, Supplier Part Number 1=CR0603-FX-9092ELFCT-ND, Tolerance=1%, Supplier 1=DigiKey, Wattage=1/10W
R5: "RMCF0603FT9K09", Resistance=9.09k, Size Package=0603, Supplier Part Number 1=RMCF0603FT9K09CT-ND, Tolerance=1%, Supplier 1=DigiKey, Wattage=1/10W
R6: "RMCF0603FT3K48", Resistance=3.48k, Size Package=0603, Supplier Part Number 1=RMCF0603FT3K48CT-ND, Tolerance=1%, Supplier 1=DigiKey, Wattage=1/10W
R7: "RMCF0603FT698R", Resistance=698, Size Package=0603, Supplier Part Number 1=RMCF0603FT698RCT-ND, Tolerance=1%, Supplier 1=DigiKey, Wattage=1/10W
R8 R15: "RMCF0603FT10K0", Resistance=10k, Size Package=0603, Supplier Part Number 1=RMCF0603FT10K0DKR-ND, Tolerance=1%, Supplier 1=DigiKey, Wattage=1/10W
R9: "RC0603FR-0730K1L", Resistance=30.1k, Size Package=0603, Supplier Part Number 1=311-30.1KHRCT-ND, Tolerance=1%, Supplier 1=DigiKey, Wattage=1/10W
R10: "ERJ-3EKF4223V", Resistance=422k, Size Package=0603, Supplier Part Number 1=P422KHDKR-ND, Tolerance=1%, Supplier 1=DigiKey, Wattage=1/10W
R11 R12: "RC0603FR-071ML", Resistance=1M, Size Package=0603, Supplier Part Number 1=311-1.00MHRDKR-ND, Tolerance=1%, Supplier 1=DigiKey, Wattage=1/10W
R16: "RC0603FR-0752K3L", Resistance=52.3k, Size Package=0603, Supplier Part Number 1=311-52.3KHRCT-ND, Tolerance=1%, Supplier 1=DigiKey, Wattage=1/10W
R18 R19: "HRG3216P-1000-D-T1", Resistance=100, Size Package=1206, Supplier Part Number 1=408-1865-1-ND, Tolerance=0.5%, Supplier 1=DigiKey, Wattage=1W
U1: "LM74810QDRRRQ1", Supplier Part Number 1=296-LM74810QDRRRQ1CT-ND, Supplier 1=DigiKey
U2: "MCP3221A0T-E/OT", Supplier Part Number 1=MCP3221A0T-E/OTCT-ND, Supplier 1=DigiKey
V1: library part "[Switching] SMD 0.8-31V 3A", "AP63301WU-7", Supplier Part Number 1=31-AP63301WU-7CT-ND, Supplier 1=DigiKey
V2: "MAX20408AFOF/VY+", Supplier Part Number 1=505-MAX20408AFOF/VY+-ND, Supplier 1=DigiKey
X1: "DF40C-20DP-0.4V(51)", Supplier Part Number 1=H11618CT-ND, Supplier 1=DigiKey, System=Connector
X2: "0353630360", Supplier Part Number 1=WM18932-ND, Supplier 1=DigiKey
X3: "1778764", Supplier Part Number 1=277-2315-1-ND, Supplier 1=DigiKey, System=Connector

## Via types
v1: diameter 0.7, hole 0.3, Top Layer to Bottom Layer, 194 vias

## Nets (pads, with @x,y where several pads share a name; then routed paths per layer and width w, separated by ;. In a path a pad name is that pad's centre, name@x,y a point inside that pad or via, vN(x,y) a via of type N, cw(c..) or ccw(c..) an arc to the next point about the centre after c; other vN are vias at no path point)
+5V: C20.1 C21.1 C22.1 C23.2 C24.2 C25.2 D3.1 L3.2 R13.2 R14.2 R16.2 U2.1 V2.13 X1.5 X1.7 X2.1 X3.1 | length 110.4
  Top Layer w0.2: X2.1 17,27.5 27.25,27.5 27.5,27.25 ; V2.13 37,40.852 37.25,41.102 v1@37.25,41.237 ; X1.7 49,66.5 49.415,66.915 47.37,66.915 X1.5
  Power Layer w0.5: v1(29,26) 26.5,26 20.25,32.25 20.25,43.3 39.45,62.5 44,62.5 48.5,67 v1(49.5,67)
  Bottom Layer w0.2: C25.2 C24.2 U2.1@16.725,23.925 ; X2.1 15.78,26.22 15.78,25.32 16.8,24.3 U2.1 ; v1(36,30) 38.75,32.75 38.75,36 37.075,37.675 R16.2 37,38.575 37,39.75 37.25,40 v1(37.25,41.25) ; R14.2 R13.2 40.825,65.325 42.5,67 v1(49.5,67)
  Bottom Layer w0.3: U2.1@16.725,23.925 U2.1
  other v1: 36.25,27.8 39,28 41,28 28,30 30,30 32,30 34,30 38,30 40,30 42,30 44,30 46,30 48,30 54,30 28.5,31.35 43.75,31.35 51.25,31.35 56.25,33.1
"+5V Reg BIAS": C9.2 R17.1 V2.11 | length 13.6
  Top Layer w0.2: V2.11@37.862,38.95 38.45,38.95 39.25,39.75 v1(39.25,41.25) 40.5,41.25 41.075,40.675 C9.2
  Bottom Layer w0.2: R17.1 35.425,39.055 36.5,40.13 36.5,41.5 37,42 38.75,42 39.154,41.596 39.154,41.346 v1(39.25,41.25)
"+5V Reg FB": R15.2 R16.1 V2.12 | length 6.6
  Top Layer w0.2: V2.12@38.037,39.475 37.825,39.475 37.55,39.75 37.55,40.537 v1@38.25,41.237
  Bottom Layer w0.2: v1(38.25,41.25) 38.25,38.675 R16.1 R15.2
"+5V Reg PGOOD": R17.2 V2.15 | length 5
  Top Layer w0.2: v1@35.75,41.237 35.75,41.102 36,40.852 V2.15
  Bottom Layer w0.2: R17.2 34.075,39.075 35.745,40.745 35.745,41.245 v1(35.75,41.25)
+12V: C16.2 C17.2 C18.2 D4.1 L2.2 R10.2 R18.2 R19.2 | length 55.5
  Top Layer w0.2: v1(11.45,25.75) 13.95,28.25 19.75,28.25 21.25,29.75
  Bottom Layer w0.2: 25,30.75 25,24.5 26.75,22.75 36,22.75 37,23.75 53,23.75 55,25.75 v1(60.8,25.75)
  other v1: 25.5,32.975 23.5,33.625
"+12V Reg BST": C8.2 V1.6 | length 2.3
  Top Layer w0.2: C8.2 14.225,38.3 V1.6
"+12V Reg FB": C16.1 R9.2 R10.1 V1.1 | length 5.3
  Top Layer w0.2: R9.2 R10.1 ; C16.1 R10.1 ; V1.1 18.8,37.55 18.075,36.825 R10.1
"+12V Reg SW": C8.1 L2.1 V1.5
  other v1: 14.5,33.625 16.2,39.25 14,39.425
\FLT: F1.6 R8.2 | length 4.2
  Top Layer w0.2: F1.6 30,44 30.5,43.5 R8.2
"BATT Switched": B3.1 C19.1 Q2.1 U1.9 | length 25.7
  Top Layer w0.2: U1.9 24.127,51.5 24.365,51.263 v1(24.5,51.263)
  Bottom Layer w0.2: v1(24.5,51.263) 24.5,48.25 28.5,44.25 34.25,44.25 v1(40,50)
  other v1: 42,50 44,50 46,50 48,50 50,50 52,50 54,50 58,50 66,50 68,50 41,52 43,52 45,52 47,52 49,52 51,52 53,52 55,52 57,52 67,52 40,54 42,54 44,54 46,54 48,54 50,54 52,54 54,54 56,54 58,54 66,54 37,56 39,56 41,56 43,56 45,56 47,56 49,56 51,56 53,56 55,56 57,56 59,56 63,56 65,56 38,58 40,58 42,58 44,58 46,58 48,58 50,58 52,58 54,58 56,58 58,58 60,58 62,58 64,58 41,60 43,60 45,60 47,60 49,60 51,60 53,60 55,60 57,60 59,60 61,60
BATT_always_on: C2.2 C3.2 C4.2 D2.2 F1.3 F1.4 Q1.3 Q2.3 R2.2 U1.10 U1.12 | length 14.9
  Top Layer w0.2: U1.10 24.2,52 25.175,52.975 C3.2 25.175,54.675 25.25,54.75 ; U1.12 21.45,53.45 22.75,54.75 ; 27.5,61 C2.2 ; 31.525,51.5 32.75,51.5 34.175,50.075 C4.2 R2.2
  other v1: 24,56 26,56 28,56 30,56 25,58 27,58 29,58 31,58 24,60 26,60 28,60 30,60 32,60
BATT_MON: R4.1 R5.2 | length 1.4
  Top Layer w0.2: R4.1 R5.2
"BATTERY IN": B2.1 C1.2 D1.2 Q1.1 U1.2 U1.3 | length 5.7
  Top Layer w0.2: 16.25,52 U1.3 ; 16.25,52.5 U1.2 ; 20.75,61.25 C1.2
  other v1: 4,50 6,50 8,50 14,50 16,50 5,52 7,52 15,52 6,54 16,54 7,56 9,56 13,56 15,56 10,58 12,58 14,58 16,58 18,58 20,58 11,60 13,60 15,60 17,60 19,60
Buzzer_Ctrl_1: Q4.1 R12.2 X1.19 | length 63.4
  Top Layer w0.2: X1.19 47.37,64.085 49.415,64.085 v1(49.5,64) ; Q4.1@65.125,33.875 R12.2@65.125,35.25 ; R12.2 65.25,35.325 v1(65.25,36.5)
  Power Layer w0.2: v1(49.5,64) 47.75,64 45,61.25 40,61.25 35.75,57 35.75,54.75 37.5,53 37.5,48.5 39.75,46.25 50.75,46.25 60,37 64.75,37 v1(65.25,36.5)
Buzzer_Ctrl_2: Q3.1 R11.2 X1.17 | length 63.8
  Top Layer w0.2: Q3.1 8.65,35.225 R11.2 8.675,36.175 12.25,39.75 12.25,41.25 15.5,44.5 v1(26,44.5) ; X1.17 49,64.5 v1(49.5,65)
  Power Layer w0.2: v1(26,44.5) 29.275,47.775 33.275,47.775 36.5,51 36.5,53.25 35.25,54.5 35.25,57.25 39.75,61.75 44.61,61.75 47.86,65 v1(49.5,65)
CAP: C3.1 U1.11 | length 2.6
  Top Layer w0.2: U1.11 22.25,52.5 22.75,53 C3.1
Current_Sense_5V: U2.3 X2.2 | length 2.6
  Bottom Layer w0.4: X2.2 17.75,26 18.7,25.05 U2.3
DGATE: Q1.2 U1.1 | length 5.3
  Top Layer w0.2: U1.1 18.55,55.05 19.265,55.765 Q1.2
Earth: L1.1 X3.MP | length 14
  Top Layer w0.2: X3.MP@25.4,21.8 25.4,21.65 26.4,20.65 27.9,20.65 32.6,20.65 34.1,20.65 35.1,21.65 35.1,21.8 37.9,21.8 38.1,21.6 L1.1@38.1,21.5
EN/UVLO: F1.2 R2.1 R3.2 | length 5.1
  Top Layer w0.2: F1.2 30.5,48.25 30.75,48.5 32.325,48.5 32.575,48.25 32.6,48.25 32.825,48.025 R2.1 R3.2
GND: B1.1 B4.1 B5.1 C1.1 C2.1 C4.1 C5.1 C6.1 C9.1 C10.1 C11.1 C12.1 C13.1 C14.1 C15.1 C17.1 C18.1 C19.2 C20.2 C21.2 C22.2 C23.1 C24.1 C25.1 D1.1 D2.1 D3.2 D4.2 F1.8 F1.9 L1.2 Q3.2 Q4.2 R3.1 R6.2 R7.1 R8.1 R9.1 R11.1 R12.1 R15.1 U1.7 U2.2 V1.4 V2.4 V2.5 V2.7 V2.8 V2.10 V2.16 X1.1 X1.2 X2.3 X3.2 | length 69.7
  Top Layer w0.2: v1(6.25,33.85) Q3.2 ; Q3.2@7.325,33.875 R11.1 R11.1@7.35,35.225 ; v1(11,33.75) 13.5,36.25 R9.1 ; v1(14,40.5) 14.135,40.5 14.435,40.2 V1.4 ; v1(18.1,31) C17.1 ; C1.1 20.825,63.75 v1(22.25,63.75) ; U1.7 21.483,50.467 22.033,50.467 22.75,49.75 v1(22.75,48.5) C5.1 ; R6.2 21.75,46.075 v1(21.75,47.25) ; C2.1 27.575,63.75 v1(29,63.75) ; C10.1 31.075,35.65 31.25,35.825 31.25,35.85 31.475,36.075 C12.1 32.875,36.075 33,35.95 v1(33,32) ; v1(30.25,46.25) 30.6,46.25 31,45.85 F1.8 ; v1(31,49.5) C4.1 ; R3.1 R7.1 R8.1 34.25,43.425 v1(34.25,42.5) ; v1@34.75,41.237 35.5,40.487 V2.16 ; v1(34.95,36.237) V2.4 ; v1(37.55,36.237) V2.8 ; V2.10@37.862,38.45 41.663,38.45 42.425,39.212 42.425,39.237 v1(43.5,39.237) ; v1(39.5,32) 39.5,35.95 39.625,36.075 C15.1 41.025,36.075 41.25,35.85 41.25,35.825 41.425,35.65 C11.1 ; L1.2 40,21.9 v1(40,24.75) ; v1(42.75,67.7) X1.2 ; X1.1 49.065,67.7 49.365,68 v1(49.5,68) ; v1(62.75,33.85) Q4.2 ; Q4.2@63.825,33.875 R12.1
  Bottom Layer w0.2: v1(12,22.575) C25.1 C24.1 ; v1(17,25.25) 17.03,25.22 17.48,25.22 17.75,24.95 U2.2 ; R15.1 42.763,38.5 v1(43.5,39.237)
  other v1: 31.5,26 44.15,35.5 28.5,36 25.5,36.025 51.25,36.65 21.25,37.85 45.75,40.95 34.75,41.25 34.7,52.263 17.25,63.5
HGATE: Q2.2 R1.1 U1.8 | length 28.7
  Top Layer w0.2: U1.8 21.5,50.95 22.55,50.95 v1(23,50.5) 23.331,50.169 23.656,50.169 R1.1 ; v1(35.25,61.25) 35.25,59.76 Q2.2
  Power Layer w0.2: v1(23,50.5) 22.25,51.25 22.25,60.75 23.5,62 34.5,62 v1(35.25,61.25)
NetB6_1: B6.1 R18.1 | length 4.4
  Bottom Layer w0.3: B6.1 62.1,27.976 62.274,27.976 63.236,27.014 63.236,25.786 R18.1
NetB6_2: B6.2 Q4.3 | length 7.3
  Top Layer w0.2: v1(61,36.076) 61,32.75 62,31.75 64.4,31.75 Q4.3
NetB7_1: B7.1 R19.1 | length 11.2
  Bottom Layer w0.3: R19.1 9.05,33.474 B7.1
NetB7_2: B7.2 Q3.3 | length 5.2
  Top Layer w0.2: Q3.3 8,30.662 9.738,28.924 v1(11.5,28.924)
NetC5_2: C5.2 R1.2 | length 1.5
  Top Layer w0.2: C5.2 R1.2
NetC7_1: C7.1 V2.2 | length 3.5
  Top Layer w0.2: C7.1 31.525,39.325 32.4,38.45 V2.2
NetC7_2: C7.2 L3.1 V2.6 | length 15.1
  Top Layer w0.2: C7.2 31.5,41.25 v1(32.75,42.5)
  Bottom Layer w0.2: v1(32.75,42.5) 31.5,41.25 31.5,36 33.8,33.7 v1(36.25,33.7)
  other v1: 36.25,36.762
NetF1_7: F1.7 R7.2 | length 3.5
  Top Layer w0.2: F1.7 30.5,44.361 30.611,44.25 32.075,44.25 32.575,44.75 32.6,44.75 32.825,44.975 R7.2
ORing_EN: U1.6 X1.11 | length 53.8
  Top Layer w0.2: v1(18.5,49.25) 18.5,50.45 U1.6 ; X1.11 49.065,65.7 49.365,66 v1(49.5,66)
  Power Layer w0.2: v1(18.5,49.25) 18.5,54 21.3,56.8 21.3,61.8 22.625,63.125 37.875,63.125 40.75,66 40.75,68 42,69.25 49.5,69.25 50.5,68.25 50.5,67 v1(49.5,66)
OV: R5.1 R6.1 U1.5 | length 7.8
  Top Layer w0.2: U1.5 17.75,51 17.579,50.829 17.579,48.171 18.925,46.825 R5.1 R6.1
SCL_5V: R13.1 U2.5 X1.18 | length 61.8
  Top Layer w0.2: v1(43.25,64.75) 43.385,64.75 43.635,64.5 X1.18
  Power Layer w0.25: v1(21.25,25) 21.25,29.25 18.75,31.75 18.75,43.235 33,57.485 40.265,64.75 v1(43.25,64.75)
  Bottom Layer w0.2: U2.5 16.8,22.3 17.25,22.75 19.25,22.75 21.154,24.654 21.154,24.904 v1(21.25,25) ; R13.1 v1(43.25,64.75)
SDA_5V: R14.1 U2.4 X1.20 | length 60.3
  Top Layer w0.2: v1(43.25,63.25) 44.1,64.1 X1.20
  Power Layer w0.25: v1(22.5,25) 22.5,29 19.5,32 19.5,43.25 39.5,63.25 v1(43.25,63.25)
  Bottom Layer w0.2: U2.4 20.25,21.5 22.5,23.75 v1(22.5,25) ; R14.1 v1(43.25,63.25)
SW: R4.2 U1.4 | length 8.2
  Top Layer w0.2: R4.2 14.825,46.825 15.5,47.5 16.5,47.5 17,48 17,51 17.5,51.5 U1.4
VREG_IN: C6.2 C10.2 C11.2 C12.2 C13.2 C14.2 C15.2 F1.5 V1.2 V1.3 V2.1 V2.3 V2.9 | length 2
  Top Layer w0.2: v1@32.75,39.237 32.885,39.237 33.173,38.95 V2.1
  other v1: 32.75,39.25 21.25,40.65 29.35,45.2
pads on no net: B6.MP B7.MP F1.1 U1.13 V2.14 V2.17 X1.3 X1.4 X1.6 X1.8 X1.9 X1.10 X1.12 X1.13 X1.14 X1.15 X1.16 X1.MP

## Polygon pours and split planes (outlines as drawn)
"BATT Switched" on Bottom Layer "Batt Switched Bottom Poly" (solid, remove dead copper, pour order 257): 34.5,59.25 38.5,59.25 ccw(c38.5,60.25) 39.5,60.25 39.5,60.75 cw(c40.5,60.75) 40.5,61.75 70.75,61.75 70.75,48 41,48 cw(c41,49.5) 39.5,49.5 39.5,53 ccw(c38,53) 38,54.5 34.5,54.5
"+12V Reg SW" on Bottom Layer "+12V SW Bottom Poly" (solid, remove dead copper, pour order 252): 12.75,31.5 16.25,31.5 ccw(c16.25,32) 16.75,32 16.75,39.5 ccw(c16.25,39.5) 16.25,40 12.75,40 ccw(c12.75,39.5) 12.25,39.5 12.25,32 ccw(c12.75,32)
GND on Bottom Layer "Bottom GND Poly" (hatched 45Degree grid 0.6 track 0.2, remove dead copper, pour order 258): 0,17 0,72.5 72.5,72.5 72.5,17
+12V on Bottom Layer "+12V Bottom Poly" (solid, remove dead copper, pour order 253): 19.5,37.25 23.75,37.25 cw(c23.75,36.75) 24.25,36.75 24.25,35.25 ccw(c24.75,35.25) 24.75,34.75 26,34.75 cw(c26.025,34.275) 26.5,34.3 26.5,30 cw(c26,30) 26,29.5 19.5,29.5 cw(c19.5,30) 19,30 19,36.75 cw(c19.5,36.75)
+5V on Bottom Layer "+5V " (solid, remove dead copper, pour order 255): 57.25,34 42.75,34 ccw(c42.75,33) 41.75,33 41.75,32 cw(c40.75,32) 40.75,31 31,31 cw(c31,32) 30,32 30,33 ccw(c29.5,33) 29.5,33.5 27.5,33.5 ccw(c27.5,33) 27,33 27,24.25 ccw(c27.5,24.25) 27.5,23.75 29.5,23.75 ccw(c29.5,24.25) 30,24.25 30,27.25 cw(c31,27.25) 31,28.25 32,28.25 cw(c32,27.25) 33,27.25 33,26.75 ccw(c34,26.75) 34,25.75 45,25.75 ccw(c45,26.75) 46,26.75 46,28.25 cw(c47,28.25) 47,29.25 57.25,29.25 ccw(c57.25,29.75) 57.75,29.75 57.75,33.5 ccw(c57.25,33.5)
BATT_always_on on Bottom Layer "Batt Always On Bottom Poly" (solid, remove dead copper, pour order 254): 22.75,61.487 34,61.487 34,55.487 cw(c33,55.487) 33,54.487 32.75,54.487 ccw(c32.75,53.488) 31.75,53.488 31.75,51.237 30.25,49.737 30.25,46.987 28.75,46.987 28.75,53.487 ccw(c27.75,53.487) 27.75,54.487 22.75,54.487
"BATTERY IN" on Bottom Layer "Batt In Bottom Poly" (solid, remove dead copper, pour order 256): 22.25,61.5 22.25,56.5 16.5,56.5 16.5,49.5 cw(c14.945,49.555) 14.889,48 0.5,48 0.5,61.5
NetC7_2 on Bottom Layer "+5V Inductor Bottom Poly" (solid, remove dead copper, pour order 251): 37,35.25 38.25,35.25 38.25,32.25 34.25,32.25 34.25,35.25 35.5,35.25 35.95,35.8 35.95,37.725 36.55,37.725 36.55,35.8
GND on Top Layer "Top GND Poly" (hatched 45Degree grid 0.6 track 0.2, remove dead copper, pour order 247): 0,17 0,72.5 72.5,72.5 72.5,17
+12V on Top Layer "+12V Top Poly" (solid, remove dead copper, pour order 241): 19.5,37.25 23.75,37.25 cw(c23.75,36.75) 24.25,36.75 24.25,35.25 ccw(c24.75,35.25) 24.75,34.75 26,34.75 cw(c26.025,34.275) 26.5,34.3 26.5,30 cw(c26,30) 26,29.5 19.5,29.5 cw(c19.5,30) 19,30 19,36.75 cw(c19.5,36.75)
+5V on Top Layer "+5V Top Poly" (solid, remove dead copper, pour order 244): 57.25,34 42.75,34 ccw(c42.75,33) 41.75,33 41.75,32 cw(c40.75,32) 40.75,31 31,31 cw(c31,32) 30,32 30,33 ccw(c29.5,33) 29.5,33.5 27.5,33.5 ccw(c27.5,33) 27,33 27,24.25 ccw(c27.5,24.25) 27.5,23.75 29.5,23.75 ccw(c29.5,24.25) 30,24.25 30,27.25 cw(c31,27.25) 31,28.25 32,28.25 cw(c32,27.25) 33,27.25 33,26.75 ccw(c34,26.75) 34,25.75 45,25.75 ccw(c45,26.75) 46,26.75 46,28.25 cw(c47,28.25) 47,29.25 57.25,29.25 ccw(c57.25,29.75) 57.75,29.75 57.75,33.5 ccw(c57.25,33.5)
VREG_IN on Top Layer "VREG Top Poly" (solid, remove dead copper, pour order 242): 28.5,45.5 29.75,45.5 29.75,43 34.5,38.25 43.75,38.25 43.75,36.85 43.65,36.75 39.25,36.75 38.5,37.5 34,37.5 33.25,36.75 28,36.75 26,38.75 18,38.75 18,41.75 24.75,41.75
BATT_always_on on Top Layer "Batt Always On Top Poly" (solid, remove dead copper, pour order 243): 22.75,61.5 34,61.5 34,55.5 cw(c33,55.5) 33,54.5 32.75,54.5 ccw(c32.75,53.5) 31.75,53.5 31.75,51.25 30.25,49.75 30.25,47 28.75,47 28.75,53.5 ccw(c27.75,53.5) 27.75,54.5 22.75,54.5
"BATTERY IN" on Top Layer "Batt In Top Poly" (solid, remove dead copper, pour order 245): 22.25,61.5 22.25,56.5 16.5,56.5 16.5,49.5 cw(c15,49.5) 15,48 0.5,48 0.5,61.5
"BATT Switched" on Top Layer "Batt Switched TopPoly" (solid, remove dead copper, pour order 246): 34.5,59.25 38.5,59.25 ccw(c38.5,60.25) 39.5,60.25 39.5,60.75 cw(c40.5,60.75) 40.5,61.75 70.75,61.75 70.75,48 41,48 cw(c41,49.5) 39.5,49.5 39.5,53 ccw(c38,53) 38,54.5 34.5,54.5
NetC7_2 on Top Layer "+5V Inductor Top Poly" (solid, remove dead copper, pour order 240): 37,35.25 38.25,35.25 38.25,32.25 34.25,32.25 34.25,35.25 35.5,35.25 35.95,35.8 35.95,37.725 36.55,37.725 36.55,35.8
"+12V Reg SW" on Power Layer "+12V SW Power Poly" (solid, remove dead copper, pour order 249): 12.75,31.5 16.25,31.5 ccw(c16.25,32) 16.75,32 16.75,39.5 ccw(c16.25,39.5) 16.25,40 12.75,40 ccw(c12.75,39.5) 12.25,39.5 12.25,32 ccw(c12.75,32)
VREG_IN on Power Layer "VREG Power Poly" (solid, remove dead copper, pour order 250): 28.5,45.5 29.75,45.5 29.75,43 33.9,38.85 43.75,38.85 43.75,36.85 43.65,36.75 39.25,36.75 38.5,37.5 34,37.5 33.25,36.75 28,36.75 26,38.75 18,38.75 18,41.75 24.75,41.75
GND on Ground Layer "GND Power Poly" (solid, remove dead copper, pour order 248): 0,17 0,72.5 72.5,72.5 72.5,17
BATT_always_on on Bottom Paste "Batt Always On Bottom Paste Poly" (solid, pour order 259): 22.75,61.487 34,61.487 34,55.487 cw(c33,55.487) 33,54.487 32.75,54.487 ccw(c32.75,53.488) 31.75,53.488 31.75,51.237 30.25,49.737 30.25,46.987 28.75,46.987 28.75,53.487 ccw(c27.75,53.487) 27.75,54.487 22.75,54.487
"BATTERY IN" on Bottom Paste "Batt In Bottom Paste Poly" (solid, pour order 260): 22.25,61.5 22.25,56.5 16.5,56.5 16.5,49.5 cw(c14.945,49.555) 14.889,48 0.5,48 0.5,61.5
"BATT Switched" on Bottom Paste "Batt Switched Bottom Paste Poly" (solid, pour order 261): 34.5,59.25 38.5,59.25 ccw(c38.5,60.25) 39.5,60.25 39.5,60.75 cw(c40.5,60.75) 40.5,61.75 70.75,61.75 70.75,48 41,48 cw(c41,49.5) 39.5,49.5 39.5,53 ccw(c38,53) 38,54.5 34.5,54.5
BATT_always_on on Bottom Solder "Batt Always On Bottom Solder Poly" (solid, pour order 262): 22.75,61.487 34,61.487 34,55.487 cw(c33,55.487) 33,54.487 32.75,54.487 ccw(c32.75,53.488) 31.75,53.488 31.75,51.237 30.25,49.737 30.25,46.987 28.75,46.987 28.75,53.487 ccw(c27.75,53.487) 27.75,54.487 22.75,54.487
"BATTERY IN" on Bottom Solder "Batt In Bottom Solder Poly" (solid, pour order 263): 22.25,61.5 22.25,56.5 16.5,56.5 16.5,49.5 cw(c15,49.5) 15,48 0.5,48 0.5,61.5
"BATT Switched" on Bottom Solder "Batt Switched Bottom Solder Poly" (solid, pour order 264): 34.5,59.25 38.5,59.25 ccw(c38.5,60.25) 39.5,60.25 39.5,60.75 cw(c40.5,60.75) 40.5,61.75 70.75,61.75 70.75,48 41,48 cw(c41,49.5) 39.5,49.5 39.5,53 ccw(c38,53) 38,54.5 34.5,54.5

## Keep-outs
Keep-Out Layer:
  the board outline again, w0.2

## Silkscreen, mask and mechanical layers (free items; w line width, h text height)
Top Overlay:
  region: 63.749,23.466 63.057,23.466 63.057,22.761 60.943,22.761 60.943,23.466 60.238,23.466 60.238,22.057 60.943,22.057 60.943,20.647 60.238,20.647 60.238,22.057 58.829,22.057 58.829,21.353 58.83,21.353 58.83,21.352 59.534,21.352 59.534,20.647 58.83,20.647 58.829,20.647 58.829,19.943 58.125,19.943 58.125,18.534 58.829,18.534 58.829,19.238 59.533,19.238 59.533,19.239 59.534,19.239 59.534,19.943 60.238,19.943 60.238,19.239 60.239,19.239 60.239,19.238 60.943,19.238 60.943,19.943 63.057,19.943 63.057,19.238 63.76,19.238 63.76,19.239 63.761,19.239 63.761,19.943 64.466,19.943 64.466,19.239 64.467,19.239 64.467,19.238 65.17,19.238 65.17,18.534 65.875,18.534 65.875,19.943 65.17,19.943 65.17,20.647 65.169,20.647 64.466,20.647 64.466,21.352 65.169,21.352 65.169,21.353 65.17,21.353 65.17,22.057 63.761,22.057 63.761,20.647 63.057,20.647 63.057,22.057 63.761,22.057 63.761,23.466 63.75,23.466
  region: 60.943,19.182 60.943,18.534 61.648,18.534 61.648,19.237 61.647,19.237 61.647,19.238 60.943,19.238 60.943,19.183
  region: 58.829,22.274 58.829,22.76 58.828,22.76 58.828,22.761 58.125,22.761 58.125,22.057 58.829,22.057 58.829,22.273
  region: 65.875,22.564 65.875,22.761 65.171,22.761 65.171,22.76 65.17,22.76 65.17,22.057 65.875,22.057 65.875,22.563
  region: 62.793,18.534 63.057,18.534 63.057,19.238 62.353,19.238 62.353,19.237 62.352,19.237 62.352,18.534 62.792,18.534
  lines w0.1: 12.5,28.5 12.5,28.5
  lines w0.3: 47.5,18.25 50.5,18.25 50.5,20.75 47.5,20.75 47.5,18.25
  text "GND" at 34.917,71 h1
  text "GND" at 6.667,46 h1
  text "GND" at 63.167,46 h1
  text "ORing Board" at 42.604,22.1 h1.2
  text "V1" at 48.2,18.9 h1.2
Bottom Overlay:
  region: 61.206,18.534 60.943,18.534 60.943,19.238 61.647,19.238 61.647,19.237 61.648,19.237 61.648,18.534 61.207,18.534
  region: 58.125,22.564 58.125,22.761 58.828,22.761 58.828,22.76 58.829,22.76 58.829,22.057 58.125,22.057 58.125,22.563
  region: 65.17,22.274 65.17,22.76 65.171,22.76 65.171,22.761 65.875,22.761 65.875,22.057 65.17,22.057 65.17,22.273
  region: 63.057,19.182 63.057,18.534 62.352,18.534 62.352,19.237 62.353,19.237 62.353,19.238 63.057,19.238 63.057,19.183
  region: 60.251,23.466 60.943,23.466 60.943,22.761 63.057,22.761 63.057,23.466 63.761,23.466 63.761,22.057 63.057,22.057 63.057,20.647 63.761,20.647 63.761,22.057 65.17,22.057 65.17,21.353 65.169,21.353 65.169,21.352 64.466,21.352 64.466,20.647 65.169,20.647 65.17,20.647 65.17,19.943 65.875,19.943 65.875,18.534 65.17,18.534 65.17,19.238 64.467,19.238 64.467,19.239 64.466,19.239 64.466,19.943 63.761,19.943 63.761,19.239 63.76,19.239 63.76,19.238 63.057,19.238 63.057,19.943 60.943,19.943 60.943,19.238 60.239,19.238 60.239,19.239 60.238,19.239 60.238,19.943 59.534,19.943 59.534,19.239 59.533,19.239 59.533,19.238 58.829,19.238 58.829,18.534 58.125,18.534 58.125,19.943 58.829,19.943 58.829,20.647 58.83,20.647 59.534,20.647 59.534,21.352 58.83,21.352 58.83,21.353 58.829,21.353 58.829,22.057 60.238,22.057 60.238,20.647 60.943,20.647 60.943,22.057 60.238,22.057 60.238,23.466 60.25,23.466
  lines w0.3: 40,19.25 43,19.25 43,21.75 40,21.75 40,19.25
  text "GND" at 37.583,71 h1
  text "BATT OUT" at 58.832,62 h1
  text "BATT IN" at 20.749,61.75 h1
  text "GND" at 9.333,46 h1
  text "GND" at 65.833,46 h1
  text "ORing Board" at 56.896,20.1 h1.2
  text "V1" at 42.3,19.9 h1.2
  text "+" at 16.083,17.75 h1
  text "S" at 18.083,17.75 h1
  text "-" at 20.083,17.75 h1
  text "+5V" at 29.35,17.75 h1
  text "GND" at 33.816,17.75 h1
Poly Planning:
  lines w0.1: 12.25,32 ccw(c12.75,32) 12.75,31.5 ; 12.25,39.5 cw(c12.75,39.5) 12.75,40 ; 15,48 ccw(c15,49.5) 16.5,49.5 ; 16.25,31.5 ccw(c16.25,32) 16.75,32 ; 16.25,40 cw(c16.25,39.5) 16.75,39.5 ; 16.5,55 cw(c18,55) 18,56.5 ; 19,30 ccw(c19.5,30) 19.5,29.5 ; 19,36.75 cw(c19.5,36.75) 19.5,37.25 ; 23.75,37.25 cw(c23.75,36.75) 24.25,36.75 ; 24.25,35.25 ccw(c24.75,35.25) 24.75,34.75 ; 26,29.5 ccw(c26,30) 26.5,30 ; 26,34.75 cw(c26,34.25) 26.5,34.25 ; 27,24.25 ccw(c27.5,24.25) 27.5,23.75 ; 27,33 cw(c27.5,33) 27.5,33.5 ; 27.75,54.5 cw(c27.75,53.5) 28.75,53.5 ; 29.5,23.75 ccw(c29.5,24.25) 30,24.25 ; 29.5,33.5 cw(c29.5,33) 30,33 ; 30,27.25 cw(c31,27.25) 31,28.25 ; 30,32 ccw(c31,32) 31,31 ; 31.75,53.5 cw(c32.75,53.5) 32.75,54.5 ; 32,28.25 cw(c32,27.25) 33,27.25 ; 33,26.75 ccw(c34,26.75) 34,25.75 ; 33,54.5 ccw(c33,55.5) 34,55.5 ; 34,61.25 34,61.5 ; 38,54.5 cw(c38,53) 39.5,53 ; 38.5,59.25 ccw(c38.5,60.25) 39.5,60.25 ; 39.5,49.5 ccw(c41,49.5) 41,48 ; 39.5,60.75 cw(c40.5,60.75) 40.5,61.75 ; 40.75,31 ccw(c40.75,32) 41.75,32 ; 41.75,33 cw(c42.75,33) 42.75,34 ; 45,25.75 ccw(c45,26.75) 46,26.75 ; 46,28.25 cw(c47,28.25) 47,29.25 ; 57.25,29.25 ccw(c57.25,29.75) 57.75,29.75 ; 57.25,34 cw(c57.25,33.5) 57.75,33.5 ; 12.25,40 12.25,31.5 16.75,31.5 16.75,40 12.25,40 ; 12.25,40 12.25,40 ; 27,33.5 30,33.5 30,31 31.5,31 33,31 41.75,31 41.75,34 57.75,34 57.75,29.25 46,29.25 46,25.75 33,25.75 33,28.25 30,28.25 30,23.75 27,23.75 27,29.25 27,33.5 ; 27,33.5 27,33.5 ; 34,61.5 22.75,61.5 22.75,54.5 28.75,54.5 28.75,47 30.25,47 30.25,49.75 31.75,51.25 31.75,54.5 34,54.5 34,61.5 ; 0.5,48 0.5,61.5 22.25,61.5 22.25,56.5 16.5,56.5 16.5,48 0.5,48 ; 18,38.75 18,41.75 24.75,41.75 28.5,45.5 29.75,45.5 29.75,43 34.5,38.25 43.75,38.25 43.75,36.75 39.25,36.75 38.5,37.5 34,37.5 33.25,36.75 28.75,36.75 28,36.75 26,38.75 23.5,38.75 18,38.75 ; 19,29.5 26.5,29.5 26.5,34.75 24.25,34.75 24.25,37.25 23,37.25 19,37.25 19,29.5 ; 34.25,32.25 34.25,35.25 35.5,35.25 35.95,35.8 35.95,37.725 36.55,37.725 36.55,35.8 37,35.25 38.25,35.25 38.25,32.25 34.25,32.25 ; 34.5,54.5 39.5,54.5 39.5,48 70.75,48 70.75,61.75 39.5,61.75 39.5,59.25 38,59.25 34.5,59.25 34.5,54.5

## Text inside footprints (layer, text, board x,y; h text height)
C19: Bottom Overlay "+" at 56.1,51.718 h1.2 r90